# Altium PCB main_ADC_PCB.PcbDoc (part 3 of 8)
Units mm, origin at the board's own origin, x right, y up, seen from the top; angles counter-clockwise.
Board outline 150 x 100 mm, 4 copper layers (Top Layer, Layer 1, Layer 2, Bottom Layer), stack 1.62 mm thick; 535 components, 354 nets, 1725 pads, 1075 vias.
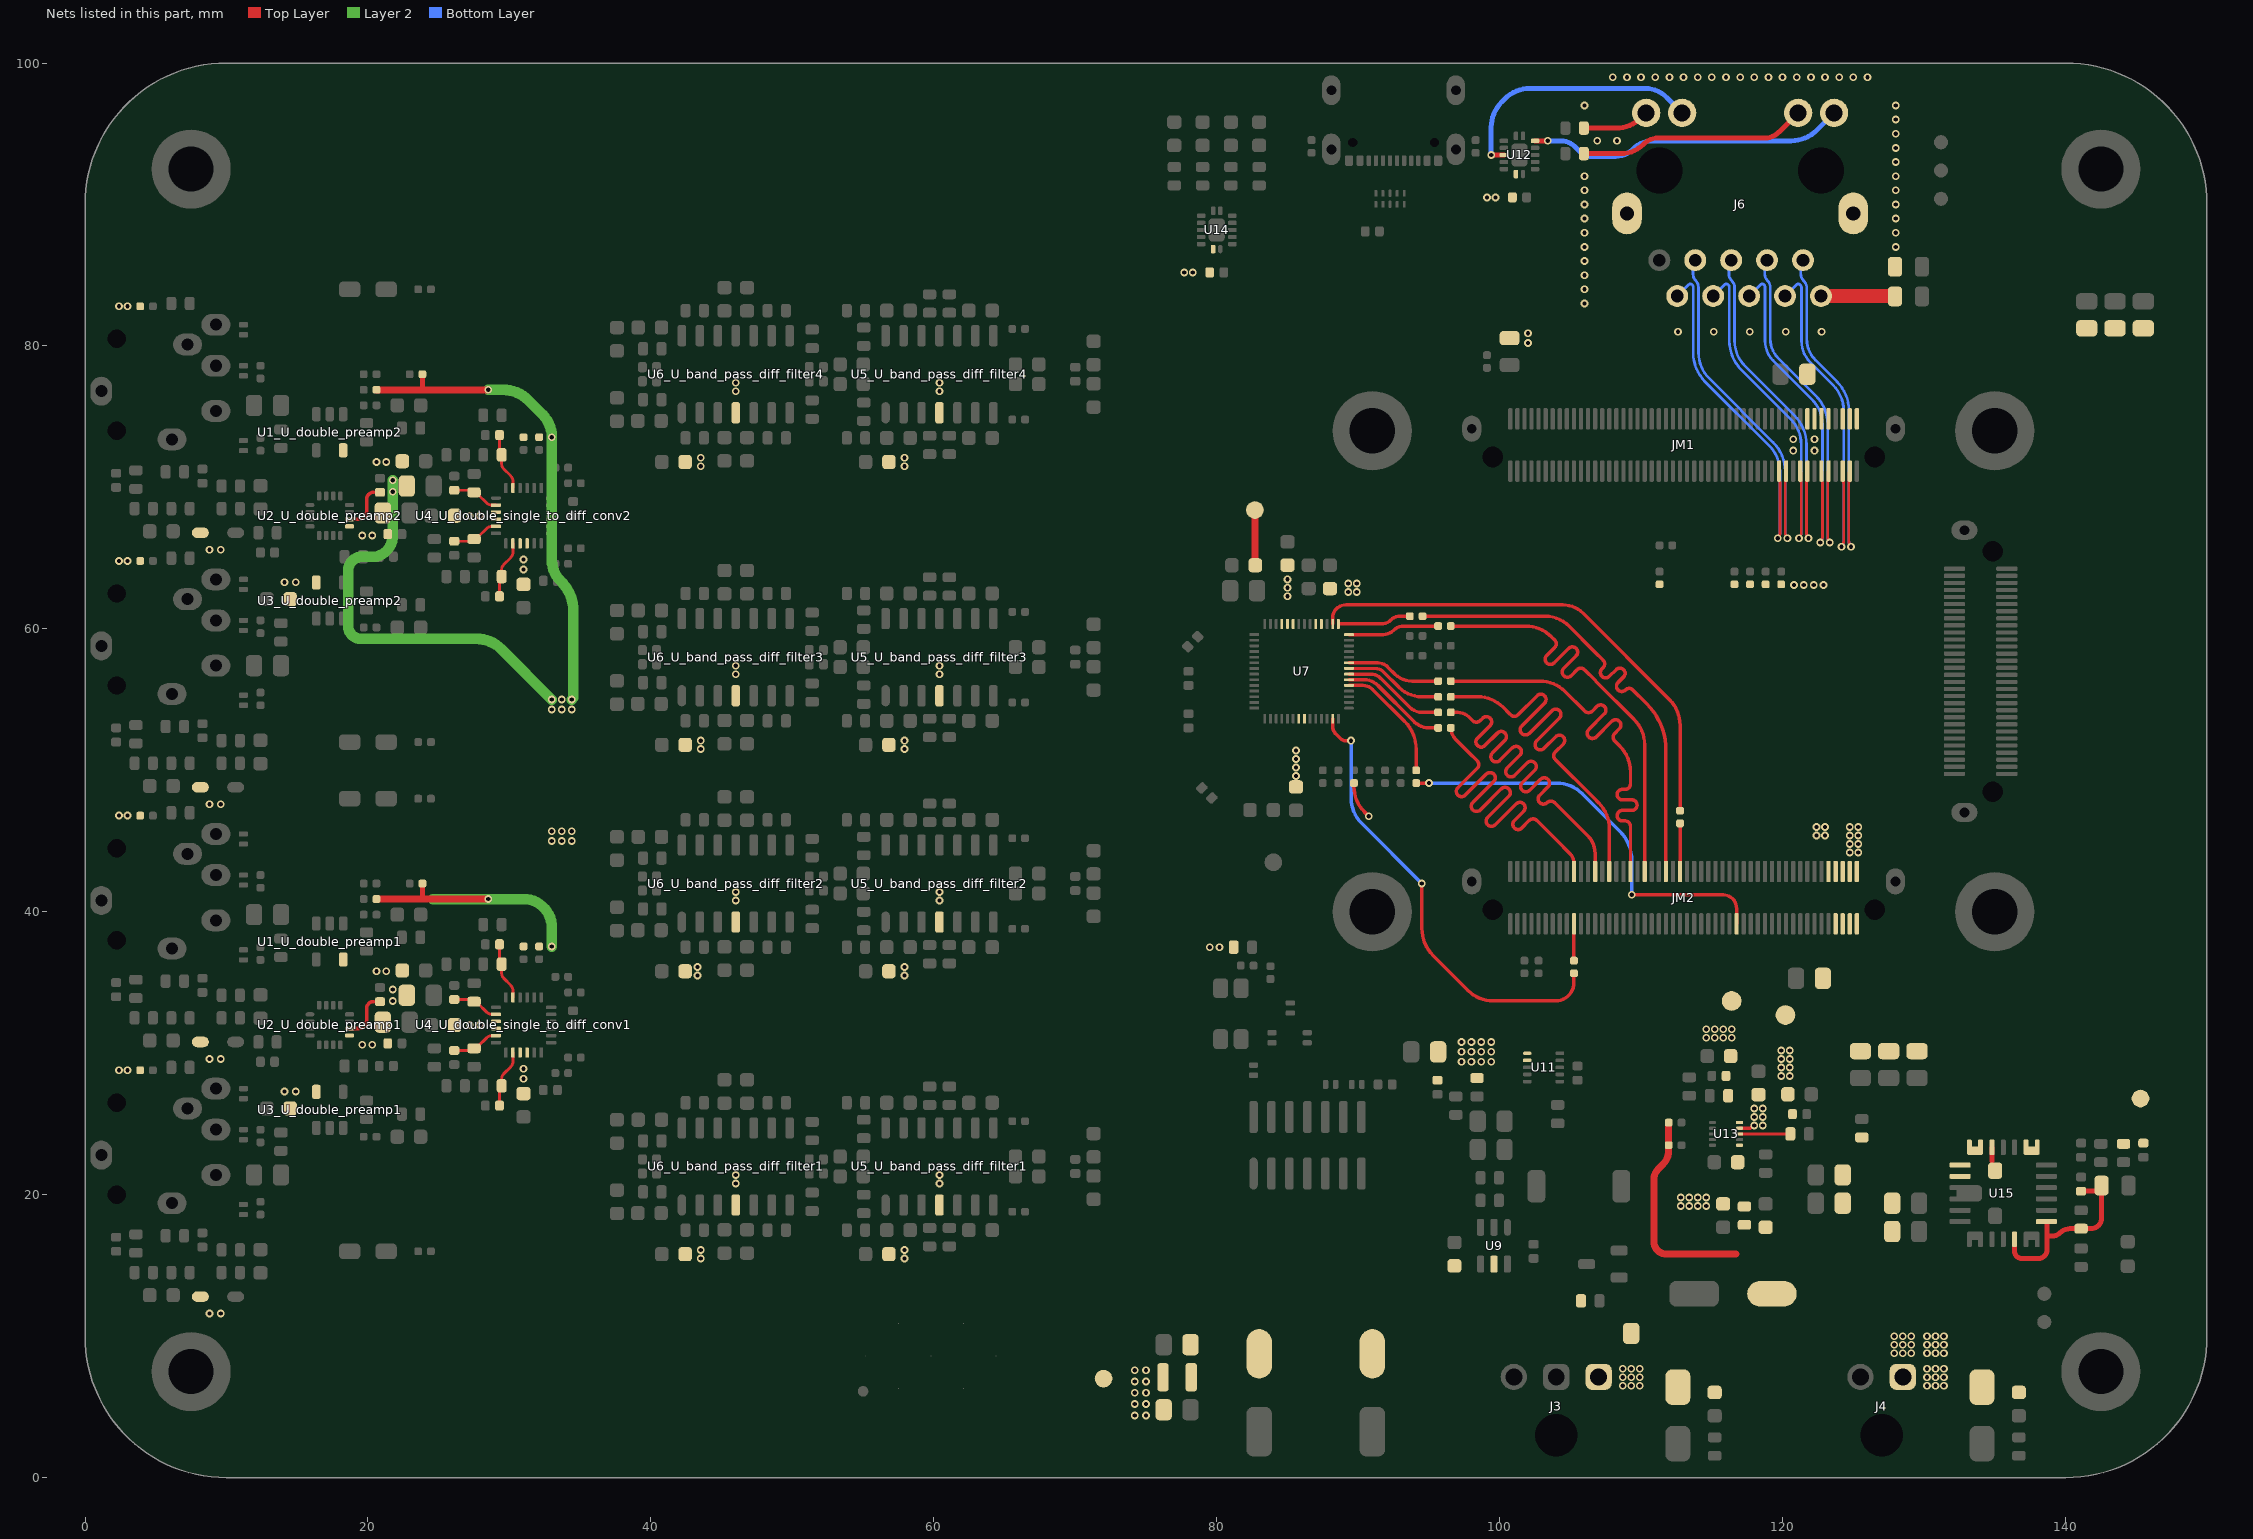
[diagram p5: the nets of this part, all layers, seen from the top]

## Part data (continued)
C7_U_double_preamp1 C7_U_double_preamp2 C8_U_double_preamp1 C8_U_double_preamp2 C10_U_double_preamp1 C10_U_double_preamp2 C11_U_double_preamp1 C11_U_double_preamp2 C17_U_double_single_to_diff_conv1 C17_U_double_single_to_diff_conv2 C18_U_double_single_to_diff_conv1 C18_U_double_single_to_diff_conv2 C29_U_band_pass_diff_filter1 C29_U_band_pass_diff_filter2 C29_U_band_pass_diff_filter3 C29_U_band_pass_diff_filter4 C30_U_band_pass_diff_filter1 C30_U_band_pass_diff_filter2 C30_U_band_pass_diff_filter3 C30_U_band_pass_diff_filter4 C41_U_band_pass_diff_filter1 C41_U_band_pass_diff_filter2 C41_U_band_pass_diff_filter3 C41_U_band_pass_diff_filter4 C42_U_band_pass_diff_filter1 C42_U_band_pass_diff_filter2 C42_U_band_pass_diff_filter3 C42_U_band_pass_diff_filter4 C57 C61 C65 C66 C67 C75: "Multilayer Ceramic Capacitors MLCC - SMD/SMT 25V 0.1uF X5R 0402 20%", Dielectric=X5R, Manufacturer="TAIYO YUDEN", Package=0402, Supplier Part Number 1=963-MSAST105SB5104MF, Tolerance=20%, Voltage=25V, Supplier 1=Mouser
C20_U_band_pass_diff_filter1 C20_U_band_pass_diff_filter2 C20_U_band_pass_diff_filter3 C20_U_band_pass_diff_filter4 C21_U_band_pass_diff_filter1 C21_U_band_pass_diff_filter2 C21_U_band_pass_diff_filter3 C21_U_band_pass_diff_filter4 C26_U_band_pass_diff_filter1 C26_U_band_pass_diff_filter2 C26_U_band_pass_diff_filter3 C26_U_band_pass_diff_filter4 C31_U_band_pass_diff_filter1 C31_U_band_pass_diff_filter2 C31_U_band_pass_diff_filter3 C31_U_band_pass_diff_filter4 C32_U_band_pass_diff_filter1 C32_U_band_pass_diff_filter2 C32_U_band_pass_diff_filter3 C32_U_band_pass_diff_filter4 C43_U_band_pass_diff_filter1 C43_U_band_pass_diff_filter2 C43_U_band_pass_diff_filter3 C43_U_band_pass_diff_filter4: library part GCM1885C2A201FA16J, "Multilayer Ceramic Capacitors MLCC - SMD/SMT 200 pF 100 VDC 1% 0603 C0G (NP0) AEC-Q200", Dielectric=C0G, Manufacturer="Murata Electronics", Package=0603, Supplier Part Number 1=81-GCM1885C2A201FA6J, Tolerance=1%, Voltage=100V, Supplier 1=Mouser
C22_U_band_pass_diff_filter1 C22_U_band_pass_diff_filter2 C22_U_band_pass_diff_filter3 C22_U_band_pass_diff_filter4 C23_U_band_pass_diff_filter1 C23_U_band_pass_diff_filter2 C23_U_band_pass_diff_filter3 C23_U_band_pass_diff_filter4 C24_U_band_pass_diff_filter1 C24_U_band_pass_diff_filter2 C24_U_band_pass_diff_filter3 C24_U_band_pass_diff_filter4 C25_U_band_pass_diff_filter1 C25_U_band_pass_diff_filter2 C25_U_band_pass_diff_filter3 C25_U_band_pass_diff_filter4 C34_U_band_pass_diff_filter1 C34_U_band_pass_diff_filter2 C34_U_band_pass_diff_filter3 C34_U_band_pass_diff_filter4 C35_U_band_pass_diff_filter1 C35_U_band_pass_diff_filter2 C35_U_band_pass_diff_filter3 C35_U_band_pass_diff_filter4 C36_U_band_pass_diff_filter1 C36_U_band_pass_diff_filter2 C36_U_band_pass_diff_filter3 C36_U_band_pass_diff_filter4 C37_U_band_pass_diff_filter1 C37_U_band_pass_diff_filter2 C37_U_band_pass_diff_filter3 C37_U_band_pass_diff_filter4: library part GCM1885C2A102FA16D, "Multilayer Ceramic Capacitors MLCC - SMD/SMT 1000 pF 100 VDC 1% 0603 C0G (NP0) AEC-Q200", Dielectric=C0G, Manufacturer="Murata Electronics", Package=0603, Supplier Part Number 1=81-GCM1885C2A102FA6D, Tolerance=1%, Voltage=100V, Supplier 1=Mouser
C27_U_band_pass_diff_filter1 C27_U_band_pass_diff_filter2 C27_U_band_pass_diff_filter3 C27_U_band_pass_diff_filter4 C39_U_band_pass_diff_filter1 C39_U_band_pass_diff_filter2 C39_U_band_pass_diff_filter3 C39_U_band_pass_diff_filter4: library part CC0603FRNPO0BN150, "Multilayer Ceramic Capacitors MLCC - SMD/SMT 100V 15pF C0G 0603 1%", Dielectric=C0G, Manufacturer=YAGEO, Package=0603, Supplier Part Number 1=603-CC603FRNPO0BN150, Tolerance=1%, Voltage=100V, Supplier 1=Mouser
C28_U_band_pass_diff_filter1 C28_U_band_pass_diff_filter2 C28_U_band_pass_diff_filter3 C28_U_band_pass_diff_filter4 C40_U_band_pass_diff_filter1 C40_U_band_pass_diff_filter2 C40_U_band_pass_diff_filter3 C40_U_band_pass_diff_filter4: library part GCM1885C2A131FA16J, "Multilayer Ceramic Capacitors MLCC - SMD/SMT 130 pF 100 VDC 1% 0603 C0G (NP0) AEC-Q200", Dielectric=C0G, Manufacturer="Murata Electronics", Package=0603, Supplier Part Number 1=81-GCM1885C2A131FA6J, Tolerance=1%, Voltage=100V, Supplier 1=Mouser
C33_U_band_pass_diff_filter1 C33_U_band_pass_diff_filter2 C33_U_band_pass_diff_filter3 C33_U_band_pass_diff_filter4 C38_U_band_pass_diff_filter1 C38_U_band_pass_diff_filter2 C38_U_band_pass_diff_filter3 C38_U_band_pass_diff_filter4 C87 C88: "Multilayer Ceramic Capacitors MLCC - SMD/SMT 25V 2200pF C0G 0402 5%", Dielectric=C0G, Manufacturer=KEMET, Package=0402, Supplier Part Number 1=80-C0402C222J3GACTU, Tolerance=5%, Voltage=25V, Supplier 1=Mouser
C47 C48 C49 C51 C52 C53 C58 C68 C69 C71 C72 C73 C74: "Multilayer Ceramic Capacitors MLCC - SMD/SMT 16V 2.2uF X5R 0603 10%", Dielectric=X5R, Manufacturer=KEMET, Package=0603, Supplier Part Number 1=80-C0603C225K4PAC, Tolerance=10%, Voltage=16V, Supplier 1=Mouser
C54 C60 C70: "Aluminum Electrolytic Capacitors - SMD 35V 100uF AEC-Q200 20% 85C/2K Hours", Manufacturer=KEMET, Package=6.3x7.7, Supplier Part Number 1=80-EDK107M035S9HAA, Tolerance=20%, Voltage=35V, Supplier 1=Mouser
C55 C56 C59 C81 C82 C83 C84 C85 C86: "Multilayer Ceramic Capacitors MLCC - SMD/SMT 22uF+/-20% 25V X5R 2 0805", Dielectric=X5R, Manufacturer="TAIYO YUDEN", Package=0805, Supplier Part Number 1=187-CL21A226MAYNNNE, Tolerance=20%, Voltage=25V, Supplier 1=Mouser
C63 C90: "Multilayer Ceramic Capacitors MLCC - SMD/SMT 16V 0.015uF X7R 0402 10%", Dielectric=X7R, Manufacturer=KEMET, Package=0402, Supplier Part Number 1=80-C0402C153K4RAC, Tolerance=10%, Voltage=16V, Supplier 1=Mouser
C92_U_double_single_to_diff_conv1 C92_U_double_single_to_diff_conv2 C93_U_double_single_to_diff_conv1 C93_U_double_single_to_diff_conv2 C94_U_double_single_to_diff_conv1 C94_U_double_single_to_diff_conv2 C95_U_double_single_to_diff_conv1 C95_U_double_single_to_diff_conv2 C96 C97: "Multilayer Ceramic Capacitors MLCC - SMD/SMT 2 pF 50 VDC 0.25 pF 0402 C0G (NP0)", Dielectric=C0G, Manufacturer="Murata Electronics", Package=0402, Supplier Part Number 1=81-GJM1555C1H2R0CB1J, Tolerance=10%, Voltage=16V, Supplier 1=Mouser
D1_U_MIC_connection1 D1_U_MIC_connection2 D1_U_MIC_connection3 D1_U_MIC_connection4: "Small Signal Switching Diodes 100 Volt 350mA 4ns", Manufacturer=Vishay, Package=SOD-323-2, Supplier Part Number 1=78-1N4148WS-E3-18, Supplier 1=Mouser
D2_U_MIC_connection1 D2_U_MIC_connection2 D2_U_MIC_connection3 D2_U_MIC_connection4 D3_U_MIC_connection1 D3_U_MIC_connection2 D3_U_MIC_connection3 D3_U_MIC_connection4 D4_U_MIC_connection1 D4_U_MIC_connection2 D4_U_MIC_connection3 D4_U_MIC_connection4: "ESD Protection Diodes / TVS Diodes Data Line Protection TVS Bi 13V 4A 10pF", Capacitance=10pF, Manufacturer="Diodes Incorporated", Package=DFN1006-2, Supplier Part Number 1=621-D12V0L1B2LP-7B, Voltage=12V, Supplier 1=Mouser
D5 D21 D22 D23: "Zener Diodes ZENER SOD-123 .83W 3.3V", Breakdown voltage=3.3V, Manufacturer=Nexperia, Package=SOD-123F-2, Supplier Part Number 1=771-BZT52H-C3V3-T/R, Supplier 1=Mouser
D6 D8 D9 D10 D11 D12: "ESD Protection Diodes / TVS Diodes SOD882 3.3V BID ESD PROTECT", Capacitance=11pF, Manufacturer=Nexperia, Package=DFN-1006-2, Supplier Part Number 1=771-PESD3V3V1BLYL, Voltage=3.3V, Supplier 1=Mouser
D7 D16: "Single Color LEDs", Color=Green, Package=0603, Supplier Part Number 1=720-P4122PHRH35A8J82, Supplier 1=Mouser
D13: "ESD Protection Diodes / TVS Diodes ESD 5V BI", Capacitance=0.3pF, Manufacturer=Nexperia, Package=DFN-2510D-10, Supplier Part Number 1=771-PESD4USB5B-TBSX, Voltage=5V, Supplier 1=Mouser
D14: "ESD Protection Diodes / TVS Diodes TVS, SMA, 150C, 400W, Unidir", Breakdown voltage=12V, Manufacturer="Diotec Semiconductor", Package=DO-214AC-2, Supplier Part Number 1=637-P4SMAJ12A, Supplier 1=Mouser
D15: "ESD Protection Diodes / TVS Diodes TVS, SMA, 150C, 400W, Unidir", Breakdown voltage=5V, Manufacturer="Diotec Semiconductor", Package=DO-214AC-2, Supplier Part Number 1=637-P4SMAJ5.0A, Supplier 1=Mouser
D17 D18 D19 D20: "Single Color LEDs", Color=Blue, Package=0603, Supplier Part Number 1=720-P4112P1R2363X4X5, Supplier 1=Mouser
D24: "Schottky Diodes & Rectifiers RECT 30V 3A SM SCHOTTKY", Current=3A, Forward Voltage=500mV, Manufacturer=Nexperia, Package=SOD123HP-2, Supplier Part Number 1=771-PMEG3030EXEX, Supplier 1=Mouser
F1: "Ferrite Beads 470Ohms RDC=0.15Ohms 1500mA", Manufacturer="Pulse Electronics", Package=0603, Supplier Part Number 1=603-BBPY160808471Y00, Supplier 1=Mouser
F2: library part BBPY00160808471Y00, "Ferrite Beads 470Ohms RDC=0.15Ohms 1500mA", Manufacturer="Pulse Electronics", Package=0603, Supplier Part Number 1=603-BBPY160808471Y00, Supplier 1=Mouser
J1_U_MIC_connection1 J1_U_MIC_connection2 J1_U_MIC_connection3 J1_U_MIC_connection4: "Phone Connectors Audio Jack, 3.5mm, Through Hole, 3 Conductors, 1 Switches", Manufacturer="Same Sky", Supplier Part Number 1=179-SJ3-35063AG, Supplier 1=Mouser
J2: "Headers & Wire Housings VERTICAL SMT TYPE HEADER", Manufacturer="Amphenol FCI", Supplier Part Number 1=649-202152100014C1LF, Supplier 1=Mouser
J3: "Headers & Wire Housings R/A HEADER 3 POS TIN SINGLE ROW", Manufacturer=Molex, Supplier Part Number 1=538-43650-0300, Pin number=3, Supplier 1=Mouser
J4: "Nr Mouser: / 538-43650-0200 / Nr prod.: / 43650-0200 / Produc.: / Molex / Nr klienta: / Nr klienta / Opis: / Headers & Wire Housings R/A HEADER 2 POS TIN SINGLE ROW", Manufacturer=Molex, Supplier Part Number 1=538-43650-0200, Pin number=2, Supplier 1=Mouser
J6: "Modular Connectors / Ethernet Connectors WE-RJ45LAN 10/100/1000BASE-T THT 1x1 LED L green/yellow LED R green/yellow", Manufacturer="Wurth Elektronik", Supplier Part Number 1=710-74991104403, Supplier 1=Mouser
J7: "USB Connectors USB Type C, 2.0 SMT PCB Top Mnt 1.20mm", Manufacturer=GCT, Supplier Part Number 1=640-USB4105-GF-A-120, Supplier 1=Mouser
JM1 JM2 JM3: "Board to Board & Mezzanine Connectors 0.50 mm Razor Beam(TM) High-Speed Hermaphroditic Terminal/Socket Strip", Manufacturer=Samtec, Supplier Part Number 1=200-LSHM15004.0LDVAS, ClassName=FPGA_Socket, Supplier 1=Mouser
L1: "Power Inductors - SMD 963-LSAPB2520MKT2R2M RPLCMT PN 1008 2.2uH 90mOhmsur", Inductance=2.2uH, Manufacturer="TAIYO YUDEN", Package=1008, Saturation Current=2.8A, Supplier Part Number 1=963-MAMK2520H2R2M, Tolerance=20%, Supplier 1=Mouser
L2: "Power Inductors - SMD 15uH 20% w/E-Field", Inductance=15uH, Manufacturer=Vishay, Package=2020, Saturation Current=2.6A, Supplier Part Number 1=70-IHLE2020CDR150M51, Tolerance=20%, Supplier 1=Mouser
MH1 MH2 MH3 MH4 MH5 MH6 MH7 MH8: library part MH
NRST: "Tactile Switches 3.5x2.9mm Right Ang Light Touch Switch", Manufacturer=Panasonic, Supplier Part Number 1=667-EVQP7A01P, Supplier 1=Mouser
R1_U_MIC_connection1 R1_U_MIC_connection2 R1_U_MIC_connection3 R1_U_MIC_connection4 R2_U_MIC_connection1 R2_U_MIC_connection2 R2_U_MIC_connection3 R2_U_MIC_connection4 R8 R15_U_double_preamp1 R15_U_double_preamp2 R20_U_double_single_to_diff_conv1 R20_U_double_single_to_diff_conv2 R33_U_double_single_to_diff_conv1 R33_U_double_single_to_diff_conv2 R69 R96 R97 R124 R125: "Thick Film Resistors - SMD 10 kOhms 1/16 W 50 V 1% 0402 100 PPM / C - 55 C + 155 C AEC-Q200", Manufacturer=YAGEO, Package=0402, Power=62.5mW, Supplier Part Number 1=603-AC0402DR-0710KL, Tolerance=0.5%, Supplier 1=Mouser
R3_U_MIC_connection1 R3_U_MIC_connection2 R3_U_MIC_connection3 R3_U_MIC_connection4 R4_U_MIC_connection1 R4_U_MIC_connection2 R4_U_MIC_connection3 R4_U_MIC_connection4 R52_U_MIC_connection1 R52_U_MIC_connection2 R52_U_MIC_connection3 R52_U_MIC_connection4 R53_U_MIC_connection1 R53_U_MIC_connection2 R53_U_MIC_connection3 R53_U_MIC_connection4: "Thick Film Resistors 2.2 kOhms 1/5 W 75 V 1% 0603 100 PPM / C - 55 C / + 155 C AEC-Q200", Manufacturer=YAGEO, Package=0603, Power=200mW, Supplier Part Number 1=603-AC0603FR-7W2K2L, Tolerance=1%, Supplier 1=Mouser
R5_U_MIC_connection1 R5_U_MIC_connection2 R5_U_MIC_connection3 R5_U_MIC_connection4 R54_U_MIC_connection1 R54_U_MIC_connection2 R54_U_MIC_connection3 R54_U_MIC_connection4: "Thick Film Resistors 2.2 kOhms 1/5 W 75 V 1% 0603 100 PPM / C - 55 C / + 155 C AEC-Q200", Manufacturer=YAGEO, Package=0603, Power=200mW, Supplier Part Number 1=603-RC0603FR-7W3KL, Tolerance=1%, Supplier 1=Mouser
R6_U_MIC_connection1 R6_U_MIC_connection2 R6_U_MIC_connection3 R6_U_MIC_connection4 R102 R103 R104 R105 R106 R108: "Thick Film Resistors - SMD General Purpose Chip Resistor 0402, 1kOhms, 5%, 1/16W", Manufacturer=YAGEO, Package=0402, Power=62.5mW, Supplier Part Number 1=603-RC0402JR-7D1KL, Tolerance=5%, Supplier 1=Mouser
R7_U_double_preamp1 R7_U_double_preamp2 R18_U_double_preamp1 R18_U_double_preamp2 R23_U_double_single_to_diff_conv1 R23_U_double_single_to_diff_conv2 R26_U_double_single_to_diff_conv1 R26_U_double_single_to_diff_conv2 R28_U_double_single_to_diff_conv1 R28_U_double_single_to_diff_conv2 R30_U_double_single_to_diff_conv1 R30_U_double_single_to_diff_conv2 R40_U_band_pass_diff_filter1 R40_U_band_pass_diff_filter2 R40_U_band_pass_diff_filter3 R40_U_band_pass_diff_filter4 R49_U_band_pass_diff_filter1 R49_U_band_pass_diff_filter2 R49_U_band_pass_diff_filter3 R49_U_band_pass_diff_filter4 R55 R56 R57 R58 R59 R60 R61 R62 R63 R64 R65 R66 R67 R68 R70 R71 R72 R73 R74 R75 R77 R79 R80_U_double_preamp1 R80_U_double_preamp2 R110 R118 R120 R126: "Thin Film Resistors - SMD 1/16W 33 Ohms 0.5% 0402 100ppm", Manufacturer=Susumu, Package=0402, Power=62.5mW, Supplier Part Number 1=754-RG1005R-330DT10, Tolerance=0.5%, Supplier 1=Mouser
R11_U_double_preamp1 R11_U_double_preamp2 R21_U_double_single_to_diff_conv1 R21_U_double_single_to_diff_conv2 R25_U_double_single_to_diff_conv1 R25_U_double_single_to_diff_conv2 R27_U_double_single_to_diff_conv1 R27_U_double_single_to_diff_conv2 R32_U_double_single_to_diff_conv1 R32_U_double_single_to_diff_conv2 R42_U_band_pass_diff_filter1 R42_U_band_pass_diff_filter2 R42_U_band_pass_diff_filter3 R42_U_band_pass_diff_filter4 R51_U_band_pass_diff_filter1 R51_U_band_pass_diff_filter2 R51_U_band_pass_diff_filter3 R51_U_band_pass_diff_filter4 R121_U_double_preamp1 R121_U_double_preamp2: "Thin Film Resistors 0603 47.5Kohm 0.1% 25ppm", Manufacturer=Panasonic, Package=0603, Power=100mW, Supplier Part Number 1=667-ERA-3AEB4752V, Tolerance=0.1%, Supplier 1=Mouser
R12_U_double_preamp1 R12_U_double_preamp2 R13_U_double_preamp1 R13_U_double_preamp2 R17_U_double_preamp1 R17_U_double_preamp2 R19_U_double_preamp1 R19_U_double_preamp2: "Thin Film Resistors 0603 1/10W 27Kohms", Manufacturer=Panasonic, Package=0603, Power=100mW, Supplier Part Number 1=667-ERA-3AEB273V, Tolerance=0.1%, Supplier 1=Mouser
R14_U_double_preamp1 R14_U_double_preamp2 R16_U_double_preamp1 R16_U_double_preamp2: "Thin Film Resistors", Manufacturer=YAGEO, Package=0603, Power=100mW, Supplier Part Number 1=603-RT0603BRE07220RL, Tolerance=0.1%, Supplier 1=Mouser
R22_U_double_single_to_diff_conv1 R22_U_double_single_to_diff_conv2 R29_U_double_single_to_diff_conv1 R29_U_double_single_to_diff_conv2: "Thin Film Resistors 17.6Kohms .1% 25ppm", Manufacturer=Vishay, Package=0603, Power=100mW, Supplier Part Number 1=71-TNPW060317K6BEEA, Tolerance=0.1%, Supplier 1=Mouser
R24_U_double_single_to_diff_conv1 R24_U_double_single_to_diff_conv2 R31_U_double_single_to_diff_conv1 R31_U_double_single_to_diff_conv2 R122: "Thin Film Resistors 1/10 Wat 1K Ohm 0.1% 0603 AEC-Q200", Manufacturer=YAGEO, Package=0603, Power=100mW, Supplier Part Number 1=603-RP0603BRD071KL, Tolerance=0.1%, Supplier 1=Mouser
R34_U_band_pass_diff_filter1 R34_U_band_pass_diff_filter2 R34_U_band_pass_diff_filter3 R34_U_band_pass_diff_filter4 R43_U_band_pass_diff_filter1 R43_U_band_pass_diff_filter2 R43_U_band_pass_diff_filter3 R43_U_band_pass_diff_filter4: "Thin Film Resistors 1/10W 31.6K ohm .1% 25ppm", Manufacturer=YAGEO, Package=0603, Power=100mW, Supplier Part Number 1=603-RT0603BRD0731K6L, Tolerance=0.1%, Supplier 1=Mouser
R35_U_band_pass_diff_filter1 R35_U_band_pass_diff_filter2 R35_U_band_pass_diff_filter3 R35_U_band_pass_diff_filter4 R44_U_band_pass_diff_filter1 R44_U_band_pass_diff_filter2 R44_U_band_pass_diff_filter3 R44_U_band_pass_diff_filter4: library part RT0603BRD0744K2L, "Thin Film Resistors 1/10W 44.2K ohm .1% 25ppm", Manufacturer=YAGEO, Package=0603, Power=100mW, Supplier Part Number 1=603-RT0603BRD0744K2L, Tolerance=0.1%, Supplier 1=Mouser
R36_U_band_pass_diff_filter1 R36_U_band_pass_diff_filter2 R36_U_band_pass_diff_filter3 R36_U_band_pass_diff_filter4 R45_U_band_pass_diff_filter1 R45_U_band_pass_diff_filter2 R45_U_band_pass_diff_filter3 R45_U_band_pass_diff_filter4: "Thin Film Resistors 0603 24.9Kohm 0.1% 25ppm", Manufacturer=Panasonic, Package=0603, Power=100mW, Supplier Part Number 1=667-ERA-3AEB2492V, Tolerance=0.1%, Supplier 1=Mouser
R37_U_band_pass_diff_filter1 R37_U_band_pass_diff_filter2 R37_U_band_pass_diff_filter3 R37_U_band_pass_diff_filter4 R46_U_band_pass_diff_filter1 R46_U_band_pass_diff_filter2 R46_U_band_pass_diff_filter3 R46_U_band_pass_diff_filter4: "Thin Film Resistors 1/10W 49.9K Ohm 0.1% 0603 25ppm", Manufacturer=Susumu, Package=0603, Power=100mW, Supplier Part Number 1=754-RG1608P-4992-BT5, Tolerance=0.1%, Supplier 1=Mouser
R38_U_band_pass_diff_filter1 R38_U_band_pass_diff_filter2 R38_U_band_pass_diff_filter3 R38_U_band_pass_diff_filter4 R47_U_band_pass_diff_filter1 R47_U_band_pass_diff_filter2 R47_U_band_pass_diff_filter3 R47_U_band_pass_diff_filter4: "Thin Film Resistors 10K ohm 0.1% 1/10W", Manufacturer=YAGEO, Package=0603, Power=100mW, Supplier Part Number 1=603-RT0603BRD0710KL, Tolerance=0.1%, Supplier 1=Mouser
R39_U_band_pass_diff_filter1 R39_U_band_pass_diff_filter2 R39_U_band_pass_diff_filter3 R39_U_band_pass_diff_filter4 R48_U_band_pass_diff_filter1 R48_U_band_pass_diff_filter2 R48_U_band_pass_diff_filter3 R48_U_band_pass_diff_filter4: "Thin Film Resistors 1/10W 22.1K ohm .1% 25ppm", Manufacturer=YAGEO, Package=0603, Power=100mW, Supplier Part Number 1=603-RT0603BRD0722K1L, Tolerance=0.1%, Supplier 1=Mouser
R41_U_band_pass_diff_filter1 R41_U_band_pass_diff_filter2 R41_U_band_pass_diff_filter3 R41_U_band_pass_diff_filter4 R50_U_band_pass_diff_filter1 R50_U_band_pass_diff_filter2 R50_U_band_pass_diff_filter3 R50_U_band_pass_diff_filter4 R82: "Thin Film Resistors 1/10W 82K ohm .1% 25ppm", Manufacturer=YAGEO, Package=0603, Power=100mW, Supplier Part Number 1=603-RT0603BRD0782KL, Tolerance=0.1%, Supplier 1=Mouser
R76 R78 R83 R109 R114 R117 R119: "Thick Film Resistors - SMD 100 kOhms 1/10 W 75 V 0.5 % 0603 100 PPM / C - 55 C / + 155 C AEC-Q200", Manufacturer=YAGEO, Package=0603, Power=100mW, Supplier Part Number 1=603-AC0603DR-07100KL, Tolerance=0.5%, Supplier 1=Mouser
R81 R93 R95: "Thin Film Resistors 15K Ohm 0.5% 1/10W 75 Volts 25ppm", Manufacturer=YAGEO, Package=0603, Power=100mW, Supplier Part Number 1=603-RT0603DRD0715KL, Tolerance=0.5%, Supplier 1=Mouser
R84: "Thin Film Resistors 1/10W 10.5K ohm .1% 25ppm", Manufacturer=YAGEO, Package=0603, Power=100mW, Supplier Part Number 1=603-RT0603BRD0710K5L, Tolerance=0.1%, Supplier 1=Mouser
R85 R112: "Thin Film Resistors 2K OHM .1% 25PPM", Manufacturer=YAGEO, Package=0603, Power=100mW, Supplier Part Number 1=603-RT0603BRD072KL, Tolerance=0.1%, Supplier 1=Mouser
R86 R107 R116 R123: "Thick Film Resistors - SMD General Purpose Chip Resistor 0805, 0Ohms, 5%, 1/8W", Manufacturer=YAGEO, Package=0805, Power=125mW, Supplier Part Number 1=603-RC0805JR-070RP, Tolerance=5%, Supplier 1=Mouser
R87 R88 R98 R99 R100 R101: "Thick Film Resistors - SMD 220 Ohms 1/5 W 75 V 1% 0603 100 PPM / C - 55 C / + 155 C AEC-Q200", Manufacturer=YAGEO, Package=0603, Power=200mW, Supplier Part Number 1=603-AC0603FR-7W220RL, Tolerance=1%, Supplier 1=Mouser
R89 R90: "Thick Film Resistors - SMD 5.1 kOhms 1/16 W 50 V 1 % 0402 100 PPM / C - 55 C / + 155 C AEC-Q200", Manufacturer=YAGEO, Package=0402, Power=62.5mW, Supplier Part Number 1=603-AC0402FR-075K1L, Tolerance=1%, Supplier 1=Mouser
R91: "Thick Film Resistors - SMD General Purpose Chip Resistor 0603, 560Ohms, 1%, 1/10W", Manufacturer=YAGEO, Package=0603, Power=100mW, Supplier Part Number 1=603-RC0603FR-07560RL, Tolerance=1%, Supplier 1=Mouser
R92: "Thin Film Resistors 1/10W 75K ohm .5% 25ppm", Manufacturer=YAGEO, Package=0603, Power=100mW, Supplier Part Number 1=603-RT0603DRD0775KL, Tolerance=0.5%, Supplier 1=Mouser
R94: "Thin Film Resistors 1/10W 34K ohm .5% 50ppm", Manufacturer=YAGEO, Package=0603, Power=100mW, Supplier Part Number 1=603-RT0603DRE0734KL, Tolerance=0.5%, Supplier 1=Mouser
R111: "Thick Film Resistors - SMD 255 kOhms 1/10 W 75 V 1 % 0603 100 PPM / C - 55 C / + 155 C AEC-Q200", Manufacturer=YAGEO, Package=0603, Power=100mW, Supplier Part Number 1=603-AC0603FR-07255KL, Tolerance=1%, Supplier 1=Mouser
R113: "Thin Film Resistors 1/10W 442 ohm .1% 25ppm", Manufacturer=YAGEO, Package=0603, Power=100mW, Supplier Part Number 1=603-RT0603BRD07442RL, Tolerance=0.1%, Supplier 1=Mouser
R115: "Thick Film Resistors - SMD 78.7 kOhms 1/10 W 75 V 1% 0603 100 PPM / C - 55 C / + 155 C AEC-Q200", Manufacturer=YAGEO, Package=0603, Power=100mW, Supplier Part Number 1=603-AC0603FR-0778K7L, Tolerance=1%, Supplier 1=Mouser
U1_U_double_preamp1 U1_U_double_preamp2 U3_U_double_preamp1 U3_U_double_preamp2: "Precision Amplifiers Single 2.9 nV/sqrt(H z) Low Noise Precis A 926-LMP7731MF/NOPB", Manufacturer="Texas Instruments", Package=SOT-23-5, Supplier Part Number 1=926-LMP7731MFE/NOPB, Supplier 1=Mouser
U2_U_double_preamp1 U2_U_double_preamp2: "Digital Potentiometer ICs 128tap, Dual DigiPOT, NVM, SPI", Manufacturer="Analog Devices", Package=LFCSP-16, Supplier Part Number 1=584-AD5122BCPZ10-R7, Supplier 1=Mouser
U4_U_double_single_to_diff_conv1 U4_U_double_single_to_diff_conv2: "Differential Amplifiers Dual Channel Low-No ise Precision 150- A 595-THS4552IRTWT", Manufacturer="Texas Instruments", Package=LFCSP-24, Supplier Part Number 1=595-THS4552IRTWR, Supplier 1=Mouser
U5_U_band_pass_diff_filter1 U5_U_band_pass_diff_filter2 U5_U_band_pass_diff_filter3 U5_U_band_pass_diff_filter4 U6_U_band_pass_diff_filter1 U6_U_band_pass_diff_filter2 U6_U_band_pass_diff_filter3 U6_U_band_pass_diff_filter4: Manufacturer="Microchip Technology", Package=SOIC-14, Supplier Part Number 1=494-MCP6489-E/SL, Supplier 1=Mouser
U7: "Analog to Digital Converters - ADC", Manufacturer="Texas Instruments", Package=VQFN-56, Supplier Part Number 1=595-ADS127L14IRSHT, Supplier 1=Mouser
U9: "Switching Voltage Regulators 36 V, 1 A synchronous step-down converter in SOT23-6L", Manufacturer=STMicroelectronics, Package=SOT23-6, Supplier Part Number 1=511-DCP3601NMR, Supplier 1=Mouser
U10: "MOSFETs SOT23 N-CH 60V .3A", Manufacturer=Nexperia, Package=SOT23-3, Supplier Part Number 1=771-2N7002NXAKR, Supplier 1=Mouser
U11: "LDO Voltage Regulators 500-mA low-noise h igh-PSRR adjustable A 595-TPS7A9001DSKR", Manufacturer="Texas Instruments", Package=SON-10, Supplier Part Number 1=595-TPS7A9001DSKT, Supplier 1=Mouser
U12 U14: "Buffers & Line Drivers SOT762-1 BUFFERS & LINE DVRS", Manufacturer=Nexperia, Package=DHVQFN-14, Supplier Part Number 1=771-LVC125ABQ115, Supplier 1=Mouser
U13: "LDO Voltage Regulators 1-A low-IQ high-PS RR adjustable dual A 595-TLV75201PDSQR", Manufacturer="Texas Instruments", Package=WSON-10, Supplier Part Number 1=595-TLV75201PDSQT, Supplier 1=Mouser
U15: "Power Management Modules 2.7V-16V, 8A, Step-Down Power Module", Manufacturer="Monolithic Power Systems (MPS)", Supplier Part Number 1=946-MPM3683GQN-7-Z, Supplier 1=Mouser

## Via types
v1: diameter 0.55, hole 0.3, Top Layer to Bottom Layer, tented both sides, 1011 vias
v2: diameter 1, hole 0.6, Top Layer to Bottom Layer, 64 vias

## Nets (pads, with @x,y where several pads share a name; then routed paths per layer and width w, separated by ;. In a path a pad name is that pad's centre, name@x,y a point inside that pad or via, vN(x,y) a via of type N, cw(c..) or ccw(c..) an arc to the next point about the centre after c; other vN are vias at no path point)
1.8VD: C53.1 C73.1 C97.1 JM2.8 JM2.10 R69.2 R94.1 TP_1.8VD.1 U7.18 U7.19 U13.8 | length 6.3
  Top Layer w0.22: U13.8@116.95,24.3 R94.1@120.55,24.3
  Top Layer w0.245: R69.2@89.7,49.1 89.7,48.852 ccw(c92.24,48.852) 90.444,47.056 v1(90.75,46.75)
  other v1: 119.9,28.4 120.5,28.4 119.9,29 120.5,29 119.9,29.6 120.5,29.6 119.9,30.2 120.5,30.2 122.4,45.4 123,45.4 122.4,46 123,46 89.3,62.6 89.9,62.6 89.3,63.2 89.9,63.2
3.3VD: C8_U_double_preamp1.2 C8_U_double_preamp2.2 C9_U_double_preamp1.2 C9_U_double_preamp2.2 C66.1 C72.1 C75.1 C96.1 JM1.10 JM1.12 JM2.2 JM2.4 JM2.6 R8.2 R15_U_double_preamp1.2 R15_U_double_preamp2.2 R20_U_double_single_to_diff_conv1.1 R20_U_double_single_to_diff_conv2.1 R33_U_double_single_to_diff_conv1.2 R33_U_double_single_to_diff_conv2.2 R92.2 R102.1 R103.1 R104.1 R105.1 R107.1 R109.2 R124.2 R125.2 TP_3.3VD.1 U2_U_double_preamp1.10 U2_U_double_preamp2.10 U12.14 U13.10 U14.14 | length 89.5
  Top Layer w0.25: U2_U_double_preamp1.10@18.7,31.75 19.35,31.75 ccw(c19.35,32.3) 19.9,32.3 19.9,33.15 cw(c20.4,33.15) 20.4,33.65 ; U2_U_double_preamp2.10@18.7,67.75 19.35,67.75 ccw(c19.35,68.3) 19.9,68.3 19.9,69.15 cw(c20.4,69.15) 20.4,69.65
  Top Layer w0.35: 23.8,40.9 ccw(c23.8,40.95) 23.85,40.95 R125.2@23.85,42 ; 23.8,76.9 ccw(c23.8,76.95) 23.85,76.95 R124.2@23.85,78
  Top Layer w0.5: R15_U_double_preamp1.2@20.6,40.9 23.8,40.9 v1(28.5,40.9) ; R15_U_double_preamp2.2@20.6,76.9 23.8,76.9 v1(28.5,76.9)
  Layer 2 w0.75: v1(21.752,70.5) v1(21.752,69.7) 21.752,66.592 cw(c20.208,66.592) 21.3,65.5 cw(c20.334,66.466) 20.334,65.1 19.6,65.1 ccw(c19.6,64.1) 18.6,64.1 18.6,60.2 ccw(c19.5,60.2) 19.5,59.3 27.648,59.3 cw(c27.648,56.76) 29.444,58.556 v1(33,55) ; 24.6,40.9 31,40.9 cw(c31,38.9) 33,38.9 v1(33,37.55) ; v1(28.5,76.9) 29.548,76.9 cw(c29.548,74.36) 31.344,76.156 32.328,75.172 cw(c30.706,73.55) v1(33,73.55) 33,64.849 ccw(c35.049,64.849) 33.6,63.4 cw(c31.591,61.261) 34.525,61.261 34.525,55.125 v1(34.4,55)
  other v1: 114.6,31.1 115.2,31.1 115.8,31.1 116.4,31.1 114.6,31.7 115.2,31.7 115.8,31.7 116.4,31.7 21.752,33.7 21.752,34.5 79.5,37.5 80.2,37.5 124.75,44.2 125.35,44.2 124.75,44.8 125.35,44.8 33,45 33.7,45 34.4,45 124.75,45.4 125.35,45.4 33,45.7 33.7,45.7 34.4,45.7 124.75,46 125.35,46 33,54.3 33.7,54.3 34.4,54.3 33.7,55 120.8,63.1 121.5,63.1 122.2,63.1 122.9,63.1 120.75,72.6 122.25,72.6 120.75,73.4 122.25,73.4 102,80.2 102,80.9 77.7,85.2 78.3,85.2 99.1,90.5 99.7,90.5
3.3VPWR: C76.2 C81.2 C82.2 C83.2 C84.2 C85.2 C86.2 C88.1 C91.2 JM1.2 JM1.4 JM1.6 JM1.14 JM1.16 JM2.1 JM2.3 JM2.5 JM2.7 R112.1 TP_3.3PWR.1 U15.1 U15.6
5VA: C4_U_double_preamp1.1 C4_U_double_preamp2.1 C11_U_double_preamp1.1 C11_U_double_preamp2.1 C12_U_double_preamp1.1 C12_U_double_preamp2.1 C13_U_double_preamp1.1 C13_U_double_preamp2.1 C16_U_double_single_to_diff_conv1.2 C16_U_double_single_to_diff_conv2.2 C19_U_double_single_to_diff_conv1.1 C19_U_double_single_to_diff_conv2.1 C44_U_band_pass_diff_filter1.2 C44_U_band_pass_diff_filter2.2 C44_U_band_pass_diff_filter3.2 C44_U_band_pass_diff_filter4.2 C45_U_band_pass_diff_filter1.2 C45_U_band_pass_diff_filter2.2 C45_U_band_pass_diff_filter3.2 C45_U_band_pass_diff_filter4.2 C48.2 C49.2 C52.1 C63.1 C64.1 R84.1 TP_5VA.1 U1_U_double_preamp1.5 U1_U_double_preamp2.5 U2_U_double_preamp1.9 U2_U_double_preamp2.9 U3_U_double_preamp1.5 U3_U_double_preamp2.5 U4_U_double_single_to_diff_conv1.3 U4_U_double_single_to_diff_conv1.4 U4_U_double_single_to_diff_conv1.9 U4_U_double_single_to_diff_conv1.10 U4_U_double_single_to_diff_conv2.3 U4_U_double_single_to_diff_conv2.4 U4_U_double_single_to_diff_conv2.9 U4_U_double_single_to_diff_conv2.10 U5_U_band_pass_diff_filter1.4 U5_U_band_pass_diff_filter2.4 U5_U_band_pass_diff_filter3.4 U5_U_band_pass_diff_filter4.4 U6_U_band_pass_diff_filter1.4 U6_U_band_pass_diff_filter2.4 U6_U_band_pass_diff_filter3.4 U6_U_band_pass_diff_filter4.4 U7.23 U7.24 U7.25 U7.49 U7.50 U11.1 U11.2 | length 3.9
  Top Layer w0.35: TP_5VA.1@82.7,68.4 TP_5VA.1@82.712,68.388
  Top Layer w0.5: C48.2@82.712,64.512 TP_5VA.1@82.712,68.388
  other v1: 43.525,15.5 57.925,15.5 43.525,16.1 57.925,16.1 46,20.8 60.4,20.8 46,21.4 60.4,21.4 14.1,27.3 14.9,27.3 31,28.2 31,28.9 97.3,29.4 98,29.4 98.7,29.4 99.4,29.4 97.3,30.1 98,30.1 98.7,30.1 99.4,30.1 19.6,30.6 20.3,30.6 97.3,30.8 98,30.8 98.7,30.8 99.4,30.8 27.2,32 27.9,32 43.3,35.5 57.925,35.5 20.6,35.8 21.3,35.8 43.3,36.1 57.925,36.1 46,40.8 60.4,40.8 46,41.4 60.4,41.4 85.6,49.6 85.6,50.2 85.6,50.8 85.6,51.4 43.525,51.5 57.925,51.5 43.525,52.1 57.925,52.1 46,56.8 60.4,56.8 46,57.4 60.4,57.4 85,62.3 85,62.9 14.1,63.3 14.9,63.3 85,63.5 31,64.2 31,64.9 19.6,66.6 20.3,66.6 27.2,68 27.9,68 43.525,71.5 57.925,71.5 20.6,71.8 21.3,71.8 43.525,72.1 57.925,72.1 46,76.8 60.4,76.8 46,77.4 60.4,77.4
5VD: C69.2 C71.2 C74.1 F1.1 U13.6 U13.9 | length 1.1
  Top Layer w0.22: U13.9@116.95,24.7 117.711,24.7 117.911,24.9 v1(118,24.9)
  other v1: 112.8,19.2 113.4,19.2 114,19.2 114.6,19.2 112.8,19.8 113.4,19.8 114,19.8 114.6,19.8 118.6,24.9 118,25.5 118.6,25.5 118,26.1 118.6,26.1
5VIN: C68.2 C70.1 C77.2 C78.2 C79.2 C80.2 D15.2 D16.1 F1.2 J4.2 R96.2 R97.2 R111.1 U15.5 U15.8 U15.9 U15.27 | length 15.8
  Top Layer w0.35: 134.8,22.4 U15.5@134.8,23.35
  Top Layer w0.5: R96.2@111.95,23.5 111.95,23.145 cw(c110.514,23.145) 111.529,22.129 111.2,21.8 ccw(c111.924,21.076) 110.9,21.076 110.9,16.7 ccw(c111.8,16.7) 111.8,15.8 116.7,15.8 ; R96.2@111.95,23.663 R97.2@111.95,25.1
  other v1: 130.2,6.5 130.8,6.5 131.4,6.5 130.2,7.1 130.8,7.1 131.4,7.1 130.2,7.7 130.8,7.7 131.4,7.7 127.9,8.8 128.5,8.8 129.1,8.8 130.2,8.8 130.8,8.8 131.4,8.8 127.9,9.4 128.5,9.4 129.1,9.4 130.2,9.4 130.8,9.4 131.4,9.4 127.9,10 128.5,10 129.1,10 130.2,10 130.8,10 131.4,10
12V_IN: C54.1 C55.1 C58.1 C60.1 D24.2 L1.1 R83.1 U9.5
12V_MIC: C56.1 D1_U_MIC_connection1.1 D1_U_MIC_connection2.1 D1_U_MIC_connection3.1 D1_U_MIC_connection4.1 L1.2 R6_U_MIC_connection1.2 R6_U_MIC_connection2.2 R6_U_MIC_connection3.2 R6_U_MIC_connection4.2 TP_12VA.1
  other v1: 74.2,4.4 75,4.4 74.2,5.2 75,5.2 74.2,6 75,6 74.2,6.8 75,6.8 74.2,7.6 75,7.6 8.8,11.6 9.6,11.6 2.4,28.8 3,28.8 8.8,29.6 9.6,29.6 2.4,46.8 3,46.8 8.8,47.6 9.6,47.6 2.4,64.8 3,64.8 8.8,65.6 9.6,65.6 2.4,82.8 3,82.8
12VIN: D7.1 D14.2 D24.1 J3.3
  other v1: 108.7,6.5 109.3,6.5 109.9,6.5 108.7,7.1 109.3,7.1 109.9,7.1 108.7,7.7 109.3,7.7 109.9,7.7
AGND: C90.2 R115.2 R116.1 U15.18 U15.21 | length 14.2
  Top Layer w0.35: U15.18@136.4,16.85 136.4,16 ccw(c136.9,16) 136.9,15.5 138.1,15.5 ccw(c138.1,16.1) 138.7,16.1 138.7,17.087 ; U15.21@138.65,18.1 138.675,18.1 138.7,18.075 138.7,17.087 ; C90.2@141.1,20.25 142.15,20.25 ccw(c142.15,20.65) R116.1@142.55,20.65 142.55,18.35 cw(c141.8,18.35) 141.8,17.6 R115.2@141.1,17.6 140.324,17.6 ccw(c140.324,16.576) 139.6,17.3 cw(c139.087,17.813) 139.087,17.087 138.7,17.087
CLKIN: R55.2 U7.16 | length 35.5
  Top Layer w0.245: U7.16@88.2,60.35 88.2,60.817 cw(c89.037,60.817) 88.445,61.409 ; 88.445,61.409 cw(c89.147,60.707) 89.147,61.7 104.451,61.7 cw(c104.451,59.651) 105.9,61.1 112.006,54.994 cw(c110.21,53.198) 112.75,53.198 R55.2@112.75,47.15
CLKIN_FPGA: JM2.52 R55.1 | length 3.4
  Top Layer w0.245: JM2.52@112.75,42.85 R55.1@112.75,46.25
CS: R71.2 U7.55 | length 32.3
  Top Layer w0.245: U7.55@88.2,53.65 88.2,53.083 ccw(c88.883,53.083) 88.4,52.6 88.759,52.241 ccw(c89.1,52.583) 89.1,52.1 v1(89.5,52.1) ; v1(94.5,42) 94.5,38.831 ccw(c97.231,38.831) 95.3,36.9 97.756,34.444 ccw(c99.552,36.24) 99.552,33.7 103.946,33.7 ccw(c103.946,35.004) 105.25,35.004 R71.2@105.25,35.65
  Bottom Layer w0.245: v1(89.5,52.1) 89.5,48.052 ccw(c92.04,48.052) 90.244,46.256 v1(94.5,42)
CS_0: 
CS_1: 
CS_FPGA: JM2.81 R71.1 | length 2.6
  Top Layer w0.245: R71.1@105.25,36.55 JM2.81@105.25,39.15
DCLK: R59.2 U7.14 | length 6.5
  Top Layer w0.245: U7.14@89.35,59.6 91.775,59.6 ; 91.776,59.6 ccw(c91.776,60.624) 92.5,59.9 cw(c93.224,59.176) 93.224,60.2 R59.2@95.65,60.2
DCLK_FPGA: JM2.62 R59.1 | length 32.3
  Top Layer w0.245: R59.1@96.55,60.2 101.848,60.2 cw(c101.848,57.66) 103.236,59.787 cw(c101.848,57.66) 103.338,59.717 103.644,59.456 103.888,59.212 cw(c103.624,58.949) 103.888,58.686 103.322,58.12 ccw(c103.585,57.856) 103.322,57.593 ccw(c103.585,57.856) 103.848,57.593 104.875,58.62 cw(c105.139,58.356) 105.402,58.62 cw(c105.139,58.356) 105.402,58.093 104.524,57.215 ccw(c104.787,56.952) 104.524,56.688 ccw(c104.787,56.952) 105.051,56.688 105.468,57.105 cw(c105.731,56.842) 105.995,57.105 106.744,56.356 106.831,56.269 109.506,53.594 cw(c107.71,51.798) 110.25,51.798 JM2.62@110.25,42.85
DOUT0: R61.2 U7.6 | length 7.6
  Top Layer w0.245: U7.6@89.35,56.4 90.434,56.4 cw(c90.434,55.034) 91.4,56 93.976,53.424 ccw(c95,54.449) 95,53 R61.2@95.65,53
DOUT0_FPGA: JM2.82 R61.1 | length 31.2
  Top Layer w0.245: R61.1@96.55,53 ccw(c97.671,53) 96.878,52.208 ; 96.878,52.208 97.799,51.287 98.413,50.673 cw(c98.149,50.41) 98.413,50.146 97.046,48.78 ccw(c97.31,48.517) 97.046,48.253 ccw(c97.31,48.517) 97.573,48.253 99.059,49.739 ; 99.059,49.739 cw(c99.322,49.475) 99.585,49.739 ; 99.585,49.739 cw(c99.322,49.475) 99.585,49.212 98.1,47.726 ccw(c98.363,47.463) 98.1,47.2 ccw(c98.363,47.463) 98.627,47.2 100.112,48.685 cw(c100.376,48.422) 100.639,48.685 cw(c100.376,48.422) 100.639,48.158 99.154,46.673 ccw(c99.417,46.41) 99.154,46.146 ccw(c99.417,46.41) 99.68,46.146 101.166,47.632 cw(c101.429,47.368) 101.693,47.632 cw(c101.429,47.368) 101.693,47.105 101.038,46.451 ccw(c101.302,46.187) 101.038,45.924 ccw(c101.302,46.187) 101.565,45.924 102.1,46.459 cw(c102.364,46.195) 102.627,46.459 103.993,45.093 104.972,44.114 cw(c104.302,43.443) 105.25,43.443 JM2.82@105.25,42.85
DOUT1: R63.2 U7.7 | length 7.3
  Top Layer w0.245: U7.7@89.35,56.8 90.876,56.8 cw(c90.876,55.776) 91.6,56.5 93.646,54.454 ccw(c94.5,55.307) 94.5,54.1 R63.2@95.65,54.1
DOUT1_FPGA: JM2.76 R63.1 | length 31.5
  Top Layer w0.245: R63.1@96.55,54.1 97.048,54.1 cw(c97.048,53.009) 97.82,53.78 98,53.6 98.087,53.513 ccw(c98.35,53.777) 98.613,53.513 98.794,53.694 cw(c99.057,53.43) 99.321,53.694 cw(c99.057,53.43) 99.321,53.167 98.433,52.279 ccw(c98.697,52.016) 98.433,51.753 ccw(c98.697,52.016) 98.96,51.753 99.847,52.64 cw(c100.111,52.377) 100.374,52.64 cw(c100.111,52.377) 100.374,52.113 99.487,51.226 ccw(c99.75,50.962) 99.487,50.699 ccw(c99.75,50.962) 100.013,50.699 100.901,51.586 cw(c101.164,51.323) 101.428,51.586 cw(c101.164,51.323) 101.428,51.06 100.54,50.172 ccw(c100.804,49.909) 100.54,49.645 ccw(c100.804,49.909) 101.067,49.645 101.954,50.533 cw(c102.218,50.27) 102.481,50.533 cw(c102.218,50.27) 102.481,50.006 101.594,49.119 ccw(c101.857,48.855) 101.594,48.592 ccw(c101.857,48.855) 102.121,48.592 102.888,49.359 cw(c103.151,49.096) 103.415,49.359 cw(c103.151,49.096) 103.415,48.832 102.828,48.245 ccw(c103.091,47.982) 102.828,47.719 ccw(c103.091,47.982) 103.355,47.719 cw(c103.618,47.455) 103.881,47.719 105.033,46.567 105.12,46.48 105.598,46.002 106.229,45.371 cw(c104.972,44.114) 106.75,44.114 JM2.76@106.75,42.85
DOUT2: R65.2 U7.8 | length 7
  Top Layer w0.245: U7.8@89.35,57.2 91.235,57.2 cw(c91.235,56.435) 91.776,56.976 92.881,55.871 ccw(c94.5,57.49) 94.5,55.2 R65.2@95.65,55.2
DOUT2_FPGA: JM2.72 R65.1 | length 31.8
  Top Layer w0.245: R65.1@96.55,55.2 98.448,55.2 cw(c98.448,52.66) 100.244,54.456 100.684,54.016 100.77,53.93 ccw(c101.034,54.193) 101.297,53.93 102.643,55.276 cw(c102.907,55.012) 103.17,55.276 cw(c102.907,55.012) 103.17,54.749 101.554,53.133 ccw(c101.818,52.87) 101.554,52.606 ccw(c101.818,52.87) 102.081,52.606 103.697,54.222 cw(c103.96,53.959) 104.224,54.222 cw(c103.96,53.959) 104.224,53.695 102.608,52.08 ccw(c102.871,51.816) 102.608,51.553 ccw(c102.871,51.816) 103.135,51.553 103.964,52.382 cw(c104.228,52.119) 104.491,52.382 cw(c104.228,52.119) 104.491,51.855 103.931,51.296 ccw(c104.195,51.032) 103.931,50.769 106.65,48.05 107.006,47.694 cw(c105.21,45.898) 107.75,45.898 JM2.72@107.75,42.85
DOUT3: R67.2 U7.9 | length 6.7
  Top Layer w0.245: U7.9@89.35,57.6 91.376,57.6 cw(c91.376,56.576) 92.1,57.3 92.6,56.8 ccw(c93.807,58.007) 93.807,56.3 ; 93.808,56.3 R67.2@95.65,56.3
DOUT3_FPGA: JM2.66 R67.1 | length 32
  Top Layer w0.245: R67.1@96.55,56.3 102.848,56.3 cw(c102.848,53.76) 104.644,55.556 105.93,54.27 106.016,54.184 ccw(c106.28,54.447) 106.543,54.184 106.878,54.519 cw(c107.141,54.255) 107.404,54.519 cw(c107.141,54.255) 107.404,53.992 106.296,52.884 ccw(c106.56,52.62) 106.296,52.357 ccw(c106.56,52.62) 106.823,52.357 107.931,53.465 cw(c108.195,53.202) 108.458,53.465 cw(c108.195,53.202) 108.458,52.938 108.123,52.603 ccw(c108.387,52.34) 108.123,52.077 108.506,51.694 108.562,51.636 cw(c106.71,49.898) 108.644,51.544 cw(c106.71,49.898) 109.25,49.898 109.25,49.03 cw(c108.877,49.03) 108.877,48.658 108.679,48.658 ccw(c108.679,48.285) 108.306,48.285 ccw(c108.679,48.285) 108.679,47.913 109.341,47.913 cw(c109.341,47.54) 109.714,47.54 cw(c109.341,47.54) 109.341,47.168 108.679,47.168 ccw(c108.679,46.795) 108.306,46.795 ccw(c108.679,46.795) 108.679,46.423 108.877,46.423 cw(c108.877,46.05) 109.25,46.05 109.25,44.1 JM2.66@109.25,42.85
ERROR: R74.2 U7.5 | length 8.6
  Top Layer w0.245: U7.5@89.35,56 90.334,56 cw(c90.334,55.012) 91.033,55.711 93.291,53.452 cw(c91.338,51.499) 94.1,51.499 R74.2@94.1,50
ERROR_FPGA: JM2.35 R74.1 | length 29.5
  Top Layer w0.245: R74.1@94.1,49.1 v1(95,49.1) ; v1@109.341,41.199 115.79,41.199 cw(c115.79,40.238) 116.75,40.238 JM2.35@116.75,39.15
  Bottom Layer w0.245: v1(95,49.1) 104.03,49.1 cw(c104.03,46.56) 105.826,48.356 108.489,45.693 108.491,45.691 cw(c106.438,43.64) 109.34,43.64 v1(109.34,41.2)
ETH_D1_N: J6.3 JM1.5 | length 26.5
  Top Layer w0.19: v1(124.162,65.8) cw(c124.398,65.8) 124.231,65.966 124.239,65.974 ccw(c124.055,66.158) 124.315,66.158 124.315,70.312 ccw(c124.281,70.312) 124.305,70.336 124.305,71.017 ccw(c124.117,71.017) JM1.5@124.25,71.15
  Bottom Layer w0.19: J6.3@120.175,83.525 120.976,84.326 cw(c121.111,84.192) 121.111,84.382 cw(c121.11,84.192) 121.255,84.314 cw(c120.991,84.092) 121.336,84.092 121.336,80.347 ccw(c123.467,80.347) 121.96,78.84 123.571,77.229 cw(c121.775,75.433) 124.315,75.433 124.315,66.168 cw(c124.03,66.168) 124.231,65.966 ccw(c124.398,65.8) v1(124.162,65.8)
ETH_D1_P: J6.2 JM1.3 | length 26.9
  Top Layer w0.19: JM1.3@124.75,71.15 ccw(c124.883,71.017) 124.695,71.017 124.695,70.394 ccw(c124.719,70.37) 124.685,70.37 124.685,66.158 ccw(c124.945,66.158) 124.761,65.974 124.769,65.966 cw(c124.602,65.8) v1(124.837,65.8)
  Bottom Layer w0.19: J6.2@121.445,86.065 ccw(c121.826,85.684) 121.287,85.684 121.287,85.104 ccw(c122.002,85.104) 121.496,84.598 cw(c120.991,84.092) 121.706,84.092 121.706,80.5 ccw(c123.837,80.5) 122.33,78.993 123.833,77.491 cw(c121.775,75.433) 124.685,75.433 124.685,66.168 ccw(c124.97,66.168) 124.769,65.966 cw(c124.602,65.8) v1(124.837,65.8)
ETH_D2_N: J6.5 JM1.11 | length 26.3
  Top Layer w0.19: v1(122.662,66.1) cw(c122.898,66.1) 122.731,66.266 122.739,66.274 ccw(c122.555,66.458) 122.815,66.458 122.815,70.37 ccw(c122.781,70.37) 122.805,70.394 122.805,71.017 ccw(c122.617,71.017) JM1.11@122.75,71.15
  Bottom Layer w0.19: J6.5@117.635,83.525 118.436,84.326 cw(c118.571,84.192) 118.571,84.382 cw(c118.562,84.192) 118.734,84.273 cw(c118.476,84.153) 118.761,84.153 118.761,80.347 ccw(c120.71,80.347) 119.331,78.969 122.071,76.229 cw(c120.275,74.433) 122.815,74.433 122.815,66.468 cw(c122.53,66.468) 122.731,66.266 ccw(c122.898,66.1) v1(122.662,66.1)
ETH_D2_P: J6.4 JM1.9 | length 26.9
  Top Layer w0.19: JM1.9@123.25,71.15 ccw(c123.383,71.017) 123.195,71.017 123.195,70.336 ccw(c123.219,70.312) 123.185,70.312 123.185,66.458 ccw(c123.445,66.458) 123.261,66.274 123.269,66.266 cw(c123.102,66.1) v1(123.337,66.1)
  Bottom Layer w0.19: J6.4@118.905,86.065 ccw(c119.286,85.684) 118.747,85.684 118.747,85.079 ccw(c119.402,85.079) 118.939,84.616 cw(c118.476,84.153) 119.131,84.153 119.131,80.5 ; 119.135,80.371 119.135,80.496 119.131,80.5 ; 122.333,76.491 119.701,79.122 cw(c121.08,80.5) 119.131,80.5 ; 122.333,76.491 cw(c120.275,74.433) 123.185,74.433 123.185,66.468 ccw(c123.47,66.468) 123.269,66.266 cw(c123.102,66.1) v1(123.337,66.1)
ETH_D3_N: J6.7 JM1.17 | length 26.1
  Top Layer w0.19: v1(121.162,66.4) cw(c121.398,66.4) 121.231,66.566 121.239,66.574 ccw(c121.055,66.758) 121.315,66.758 121.315,70.37 ccw(c121.281,70.37) 121.305,70.394 121.305,71.017 ccw(c121.117,71.017) JM1.17@121.25,71.15
  Bottom Layer w0.19: J6.7@115.095,83.525 115.896,84.326 cw(c116.031,84.192) 116.031,84.382 cw(c116.027,84.192) 116.186,84.295 cw(c115.925,84.126) 116.236,84.126 116.236,80.369 ccw(c119.146,80.369) 117.088,78.312 120.571,74.829 cw(c118.775,73.033) 121.315,73.033 121.315,66.758 cw(c121.055,66.758) 121.239,66.574 121.231,66.566 ccw(c121.398,66.4) v1(121.162,66.4)
ETH_D3_P: J6.6 JM1.15 | length 26.5
  Top Layer w0.19: JM1.15@121.75,71.15 ccw(c121.883,71.017) 121.695,71.017 121.695,70.394 ccw(c121.719,70.37) 121.685,70.37 121.685,66.758 ccw(c121.945,66.758) 121.761,66.574 121.769,66.566 cw(c121.602,66.4) v1(121.837,66.4)
  Bottom Layer w0.19: J6.6@116.365,86.065 ccw(c116.746,85.684) 116.207,85.684 116.207,85.09 ccw(c116.888,85.09) 116.406,84.608 cw(c115.925,84.126) 116.606,84.126 116.606,80.369 ccw(c119.146,80.369) 117.35,78.573 120.833,75.091 cw(c118.775,73.033) 121.685,73.033 121.685,66.758 ccw(c121.945,66.758) 121.761,66.574 121.769,66.566 cw(c121.602,66.4) v1(121.837,66.4)
ETH_D4_N: J6.9 JM1.23 | length 26.5
  Top Layer w0.19: v1(119.662,66.4) cw(c119.898,66.4) 119.731,66.566 119.739,66.574 ccw(c119.555,66.758) 119.815,66.758 119.815,70.37 ccw(c119.781,70.37) 119.805,70.394 119.805,71.017 ccw(c119.617,71.017) JM1.23@119.75,71.15
  Bottom Layer w0.19: J6.9@112.555,83.525 113.356,84.326 cw(c113.491,84.192) 113.491,84.382 cw(c113.482,84.192) 113.654,84.272 cw(c113.396,84.153) 113.681,84.153 113.681,79.525 ccw(c116.591,79.525) 114.533,77.467 119.071,72.929 cw(c117.275,71.133) 119.815,71.133 119.815,66.768 cw(c119.53,66.768) 119.731,66.566 ccw(c119.898,66.4) v1(119.662,66.4)
ETH_D4_P: J6.8 JM1.21 | length 27
  Top Layer w0.19: JM1.21@120.25,71.15 ccw(c120.383,71.017) 120.195,71.017 120.195,70.394 ccw(c120.219,70.37) 120.185,70.37 120.185,66.758 ccw(c120.445,66.758) 120.261,66.574 120.269,66.566 cw(c120.102,66.4) v1(120.337,66.4)
  Bottom Layer w0.19: J6.8@113.825,86.065 ccw(c114.206,85.684) 113.667,85.684 113.667,85.079 ccw(c114.322,85.079) 113.859,84.616 cw(c113.396,84.153) 114.051,84.153 114.051,79.525 ccw(c116.591,79.525) 114.794,77.729 119.333,73.191 cw(c117.275,71.133) 120.185,71.133 120.185,66.768 ccw(c120.47,66.768) 120.269,66.566 cw(c120.102,66.4) v1(120.337,66.4)
ETH_GND: J6.MT1 J6.MT2 R86.1
  other v1: 112.6,81 115.14,81 117.68,81 120.22,81 122.76,81 106,83 106,84 106,85 106,86 106,87 128,87 106,88 128,88 106,89 128,89 106,90 128,90 106,91 128,91 106,92 128,92 128,93 128,94 106.9,94.5 108.3,94.5 128,95 128,96 106,97 128,97 108,99 109,99 110,99 111,99 112,99 113,99 114,99 115,99 116,99 117,99 118,99 119,99 120,99 121,99 122,99 123,99 124,99 125,99 126,99
ETH_LED_11: J6.11 U12.6 | length 22.5
  Top Layer w0.35: U12.6@102.5,94.5 v1(103.4,94.5)
  Bottom Layer w0.35: v1(103.4,94.5) 104.334,94.5 cw(c104.334,93.134) 105.3,94.1 105.717,93.683 ccw(c106.4,94.366) 106.4,93.4 108.193,93.4 ccw(c108.193,95.107) 109.4,93.9 cw(c110.849,92.451) 110.849,94.5 120.613,94.5 ccw(c120.613,97.04) 122.409,95.244 J6.11@123.64,96.475
ETH_LED_12: J6.12 R87.1 | length 16.1
  Top Layer w0.35: R87.1@105.95,93.6 108.584,93.6 ccw(c108.584,95.804) 110.142,94.245 cw(c111.239,93.148) 111.239,94.7 118.734,94.7 ccw(c118.734,96.126) 119.743,95.118 J6.12@121.1,96.475
ETH_LED_21: J6.13 U12.11 | length 18.5
  Top Layer w0.35: v1(99.4,93.5) U12.11@100.3,93.5
  Bottom Layer w0.35: v1(99.4,93.5) 99.4,95.448 cw(c101.94,95.448) 100.144,97.244 100.356,97.456 cw(c102.152,95.66) 102.152,98.2 110.3,98.2 cw(c110.3,96.088) 111.794,97.581 J6.13@112.9,96.475
ETH_LED_22: J6.14 R88.1 | length 4.7
  Top Layer w0.35: R88.1@105.95,95.4 108.233,95.4 ccw(c108.233,97.94) 110.029,96.144 J6.14@110.36,96.475
ETH_REF: J6.1 R123.1 | length 5.2
  Top Layer w1: J6.1@122.715,83.525 127.89,83.525 cw(c127.89,83.44) R123.1@127.95,83.5
FB_1+_U_double_single_to_diff_conv1: C93_U_double_single_to_diff_conv1.1 R25_U_double_single_to_diff_conv1.1 U4_U_double_single_to_diff_conv1.2 | length 3.3
  Top Layer w0.2: C93_U_double_single_to_diff_conv1.1@26.1,33.8 27.138,33.8 cw(c27.138,33.288) R25_U_double_single_to_diff_conv1.1@27.5,33.65 cw(c27.5,33.288) 27.756,33.544 28.4,32.9 ccw(c28.762,33.262) 28.762,32.75 U4_U_double_single_to_diff_conv1.2@29.048,32.75
FB_1+_U_double_single_to_diff_conv2: C93_U_double_single_to_diff_conv2.1 R25_U_double_single_to_diff_conv2.1 U4_U_double_single_to_diff_conv2.2 | length 3.3
  Top Layer w0.2: C93_U_double_single_to_diff_conv2.1@26.1,69.8 27.138,69.8 cw(c27.138,69.288) R25_U_double_single_to_diff_conv2.1@27.5,69.65 cw(c27.5,69.288) 27.756,69.544 28.4,68.9 ccw(c28.762,69.262) 28.762,68.75 U4_U_double_single_to_diff_conv2.2@29.048,68.75
FB_1-_U_double_single_to_diff_conv1: C92_U_double_single_to_diff_conv1.1 R21_U_double_single_to_diff_conv1.1 U4_U_double_single_to_diff_conv1.23 | length 4.1
  Top Layer w0.2: C92_U_double_single_to_diff_conv1.1@29.3,37.7 29.3,36.662 ccw(c29.812,36.662) R21_U_double_single_to_diff_conv1.1@29.45,36.3 29.45,35.662 ccw(c29.962,35.662) 29.6,35.3 30.1,34.8 cw(c29.738,34.438) 30.25,34.438 U4_U_double_single_to_diff_conv1.23@30.25,33.952
FB_1-_U_double_single_to_diff_conv2: C92_U_double_single_to_diff_conv2.1 R21_U_double_single_to_diff_conv2.1 U4_U_double_single_to_diff_conv2.23 | length 4.1
  Top Layer w0.2: C92_U_double_single_to_diff_conv2.1@29.3,73.7 29.3,72.662 ccw(c29.812,72.662) R21_U_double_single_to_diff_conv2.1@29.45,72.3 29.45,71.662 ccw(c29.962,71.662) 29.6,71.3 30.1,70.8 cw(c29.738,70.438) 30.25,70.438 U4_U_double_single_to_diff_conv2.23@30.25,69.952
FB_2+_U_double_single_to_diff_conv1: C95_U_double_single_to_diff_conv1.1 R32_U_double_single_to_diff_conv1.1 U4_U_double_single_to_diff_conv1.8 | length 4.1
  Top Layer w0.2: C95_U_double_single_to_diff_conv1.1@29.3,26.3 29.3,27.338 cw(c29.812,27.338) R32_U_double_single_to_diff_conv1.1@29.45,27.7 29.45,28.185 cw(c29.962,28.185) 29.6,28.548 30.1,29.048 ccw(c29.738,29.41) 30.25,29.41 U4_U_double_single_to_diff_conv1.8@30.25,30.048
FB_2+_U_double_single_to_diff_conv2: C95_U_double_single_to_diff_conv2.1 R32_U_double_single_to_diff_conv2.1 U4_U_double_single_to_diff_conv2.8 | length 4.1
  Top Layer w0.2: C95_U_double_single_to_diff_conv2.1@29.3,62.3 29.3,63.338 cw(c29.812,63.338) R32_U_double_single_to_diff_conv2.1@29.45,63.7 29.45,64.185 cw(c29.962,64.185) 29.6,64.548 30.1,65.048 ccw(c29.738,65.41) 30.25,65.41 U4_U_double_single_to_diff_conv2.8@30.25,66.048
FB_2-_U_double_single_to_diff_conv1: C94_U_double_single_to_diff_conv1.1 R27_U_double_single_to_diff_conv1.1 U4_U_double_single_to_diff_conv1.5 | length 3.3
  Top Layer w0.2: C94_U_double_single_to_diff_conv1.1@26.1,30.2 27.138,30.2 ccw(c27.138,30.712) R27_U_double_single_to_diff_conv1.1@27.5,30.35 ccw(c27.5,30.712) 27.756,30.456 28.4,31.1 cw(c28.762,30.738) 28.762,31.25 U4_U_double_single_to_diff_conv1.5@29.048,31.25
FB_2-_U_double_single_to_diff_conv2: C94_U_double_single_to_diff_conv2.1 R27_U_double_single_to_diff_conv2.1 U4_U_double_single_to_diff_conv2.5 | length 3.3
  Top Layer w0.2: C94_U_double_single_to_diff_conv2.1@26.1,66.2 27.138,66.2 ccw(c27.138,66.712) R27_U_double_single_to_diff_conv2.1@27.5,66.35 ccw(c27.5,66.712) 27.756,66.456 28.4,67.1 cw(c28.762,66.738) 28.762,67.25 U4_U_double_single_to_diff_conv2.5@29.048,67.25
FSYNC: R57.2 U7.15 | length 5.1
  Top Layer w0.245: U7.15@88.655,60.35 91.642,60.35 ; 91.643,60.35 ccw(c91.643,61.272) 92.295,60.62 cw(c92.971,59.944) 92.971,60.9 R57.2@93.65,60.9
FSYNC_FPGA: JM2.56 R57.1 | length 33.6
  Top Layer w0.245: R57.1@94.55,60.9 94.688,60.9 103.2,60.9 cw(c103.2,58.486) 104.908,60.192 106.7,58.4 107.313,57.787 cw(c107.05,57.523) 107.313,57.26 107.227,57.173 ccw(c107.49,56.91) 107.227,56.646 ccw(c107.49,56.91) 107.754,56.646 108.23,57.123 cw(c108.493,56.859) 108.757,57.123 cw(c108.493,56.859) 108.757,56.596 108.367,56.206 ccw(c108.63,55.943) 108.367,55.679 ccw(c108.63,55.943) 108.894,55.679 cw(c109.157,55.416) 109.421,55.679 110.357,54.743 110.4,54.7 cw(c107.141,51.441) 111.75,51.44 ; JM2.56@111.75,42.85 111.75,51.438